# Altium PCB PCB1.PcbDoc
Units mm, origin at the board's own origin, x right, y up, seen from the top; angles counter-clockwise.
Board outline 59.2 x 79.4 mm, 2 copper layers (Top Layer, Bottom Layer); 43 components, 55 nets, 214 pads, 7 vias.
Unrouted connection lines stored in the file: 2.
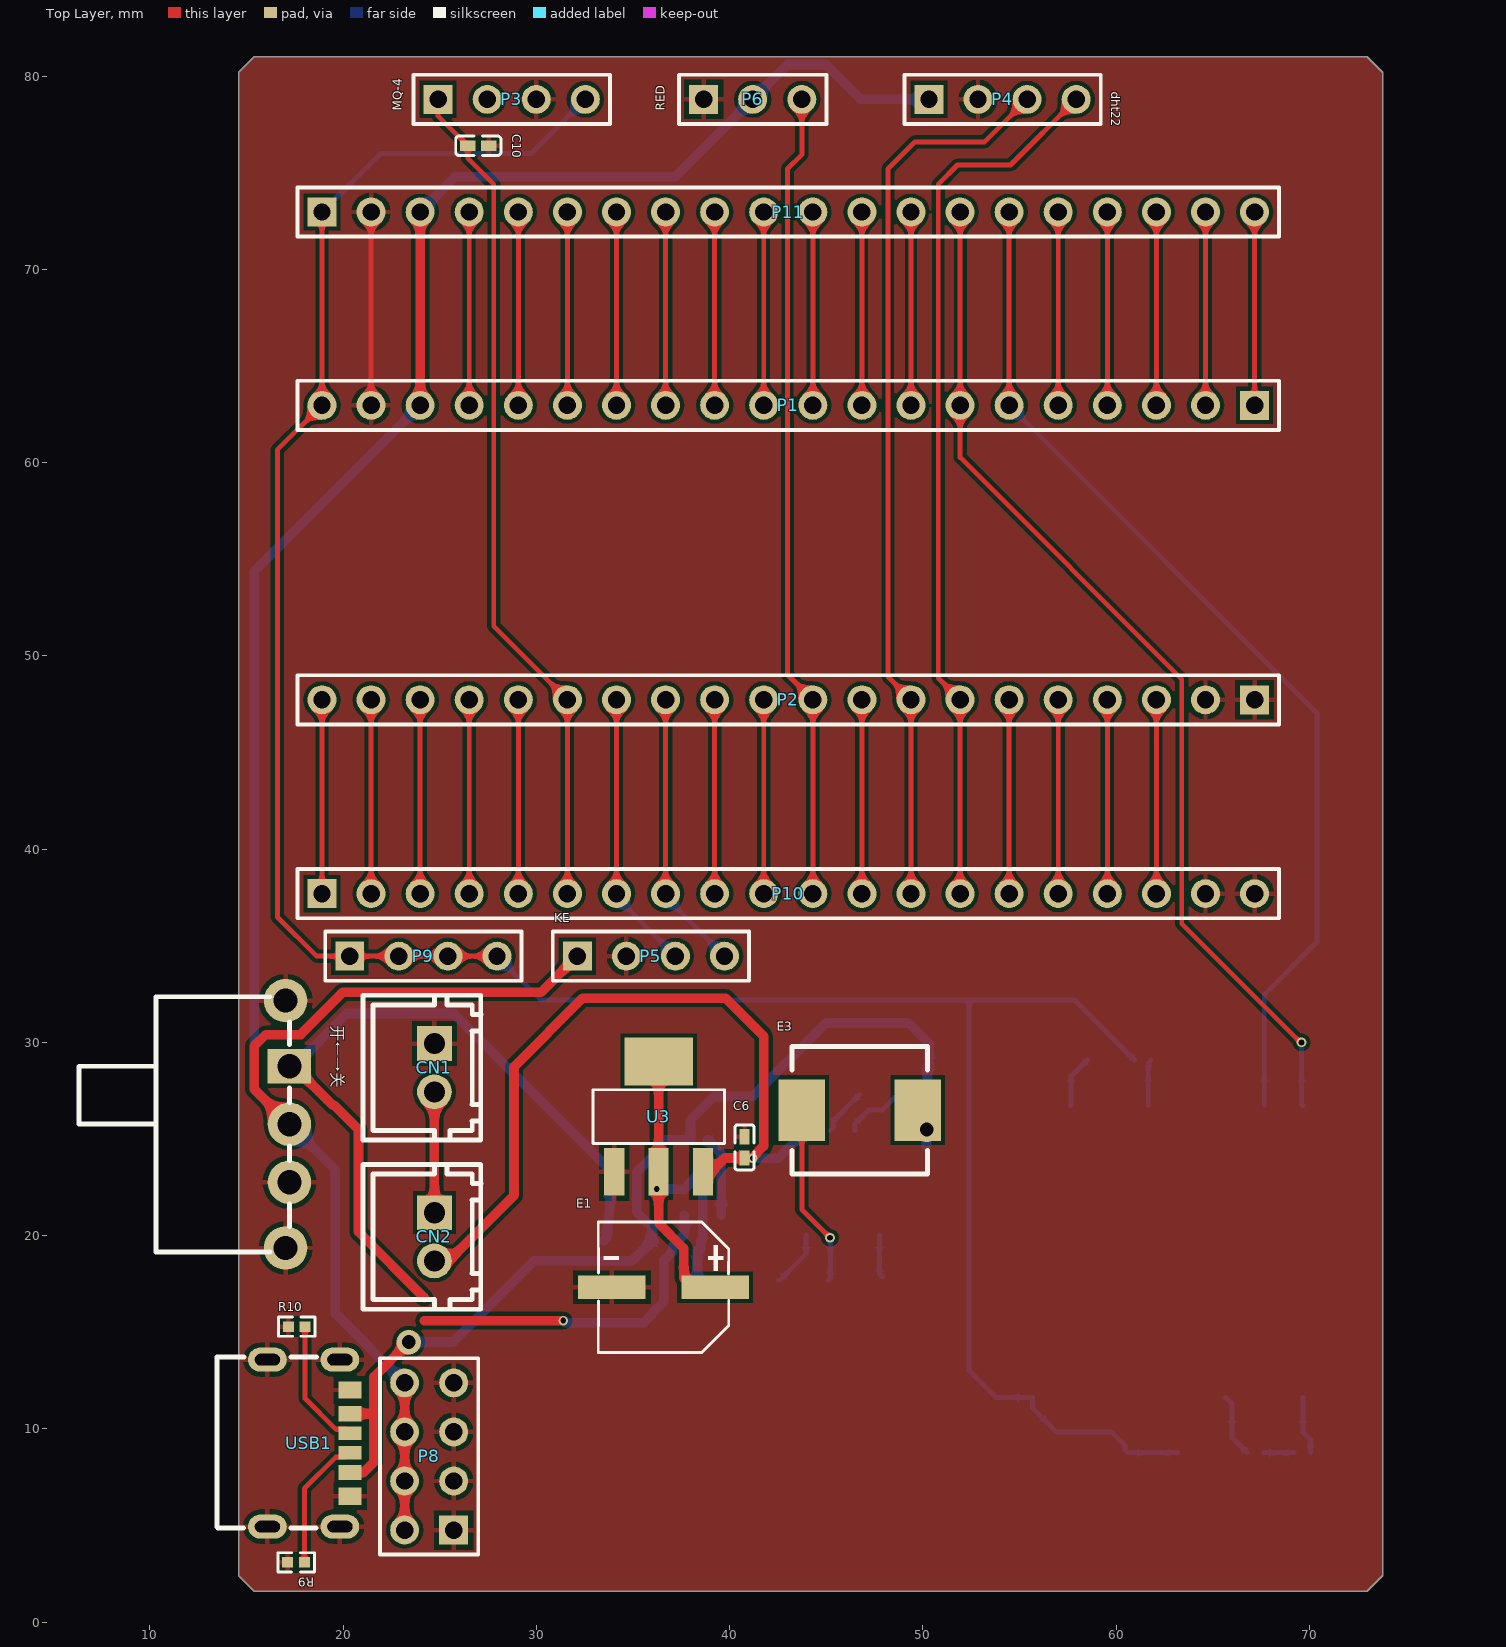
[diagram p0: Top Layer view]
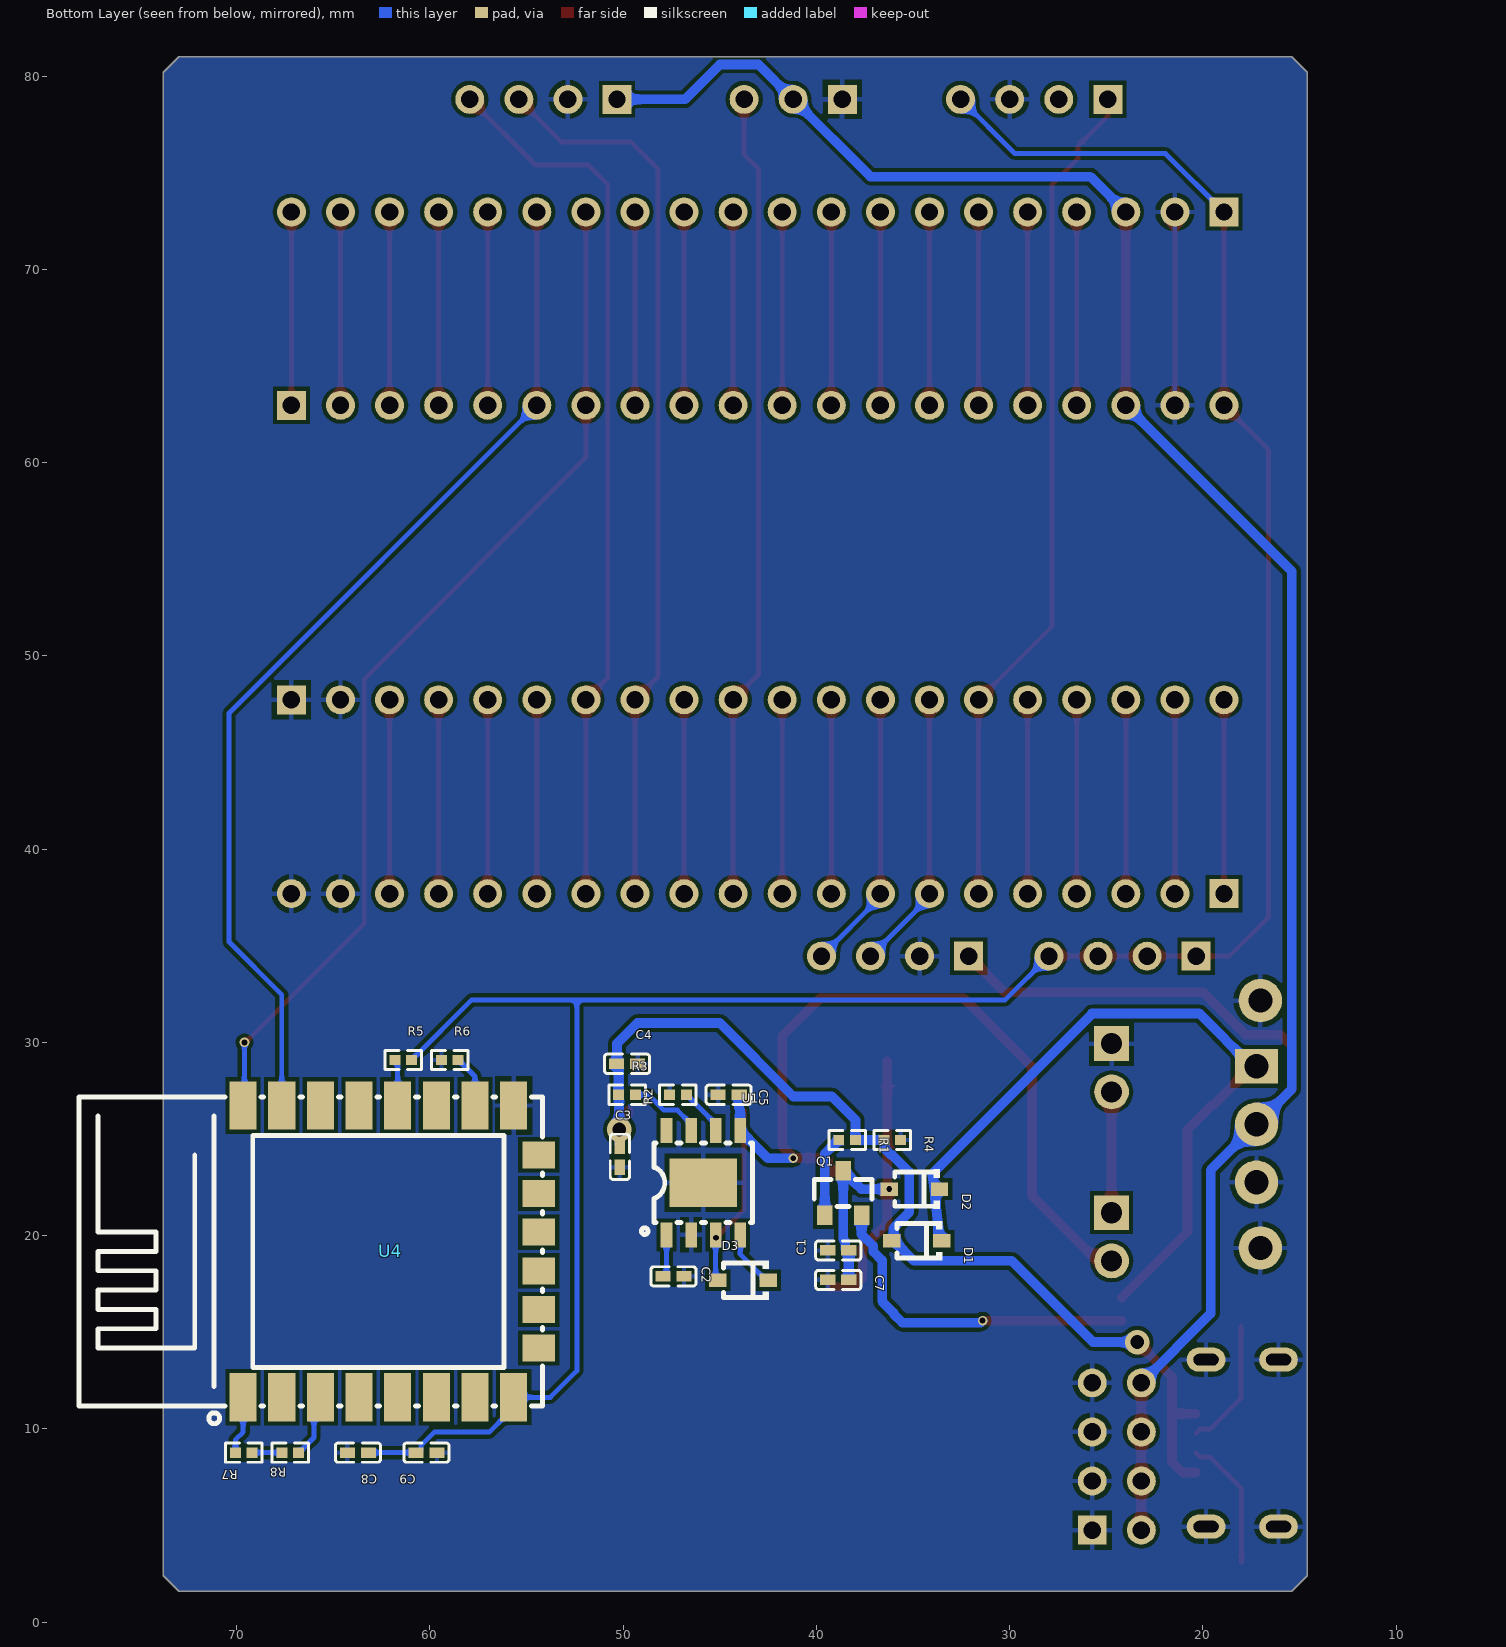
[diagram p1: Bottom Layer view, seen from below]

## Layer stack, top to bottom
Top Solder: solder mask 0.0102, Solder Resist, Dk 3.5
Top Layer: signal copper 0.0356
Dielectric 1: dielectric 0.32, FR-4, Dk 4.8
Bottom Layer: signal copper 0.0356
Bottom Solder: solder mask 0.0102, Solder Resist, Dk 3.5

## Board outline
14.6,2.4 14.6,80.2 15.4,81 73,81 73.8,80.2 73.8,2.4 73,1.6 15.4,1.6

## Design rules (kind name [scope] priority, off if disabled: settings)
Clearance [All] p1: gap=0.2 ignorepadtopadclearanceinfootprint=TRUE
DiffPairsRouting [All] p1: maxlimit=0.254 minlimit=0.1 mostfreqgap=0.254 toplayer_minwidth=0.381 toplayer_maxwidth=0.5 toplayer_prefwidth=0.381 bottomlayer_minwidth=0.381 bottomlayer_maxwidth=0.5 bottomlayer_prefwidth=0.381 maxuncoupledlength=12.7
PolygonConnect [All] p1: connectstyle=Relief reliefconductorwidth=0.254 reliefentries=4 polygonreliefangle="90 Angle" airgapwidth=0.254
RoutingVias [All] p1: holewidth=0.711 width=1.27 viastyle="Through Hole" minholewidth=0.711 minwidth=1.27 maxholewidth=0.711 maxwidth=1.27
SolderMaskExpansion [All] p1: expansion=0.102 istentingtop=FALSE
Width [All] p1: maxlimit=2 minlimit=0.254 preferedwidth=0.254 minimp=50.000000 maximp=50.000000 favimp=50.000000
29 further rules are at their usual default settings.

## Components (designator, comment, footprint, x,y, rotation, side; value= is the part's Value field where it differs from the comment)
C1 "10uF" C0402 38.869,19.231 r180 bottom value=100nF
C2 "10uF" C0402 47.4,17.89 r180 bottom value=100nF
C3 "0.1uF" C0402 50.17,24.076 r90 bottom value=100nF
C4 "10uF" C0402 49.8,28.89 r0 bottom value=100nF
C5 "10uF" C0402 44.545,27.29 r0 bottom value=100nF
C6 "104" C0402 40.774,24.565 r90 top value=100nF
C7 "104" C0402 38.869,17.707 r180 bottom value=100nF
C8 "10uF" C0402 63.727,8.769 r0 bottom value=100nF
C9 "100nF" C0402 60.182,8.769 r180 bottom
C10 "100nF" C0402 27,76.4 r0 top
CN1 "ZX-XH2.54-2PZZ" CONN-TH_2P-P2.50_HX25003-2A 24.727,28.687 r270 top
CN2 "ZX-XH2.54-2PZZ" CONN-TH_2P-P2.50_HX25003-2A 24.727,19.937 r270 top
D1 "1N5819" SOD-323_L1.6-W1.3-LS2.7-RD 34.805,19.739 r0 bottom
D2 "1N5819" SOD-323_L1.6-W1.3-LS2.7-RD 34.932,22.406 r0 bottom
D3 "1N5819WS S4_C2927280" SOD-323_L1.6-W1.3-LS2.7-RD 43.8,17.69 r0 bottom
E1 "220uf" CAP-SMD_BD6.3-L6.6-W6.6-FD 36.583,17.326 r180 top value=220uF
E3 "XR0630-100M" IND-SMD_L7.0-W6.6 46.741,26.489 r0 top value=10uH
P1 "Header 20" HDR1X20 67.17,62.968 r180 top
P2 "Header 20" HDR1X20 67.17,47.728 r180 top
P3 "MQ-4" HDR1X4 24.92,78.8 r0 top
P4 "dht22" HDR1X4 50.32,78.8 r0 top
P5 "KE" HDR1X4 32.12,34.46 r0 top
P6 "RED" HDR1X3 38.66,78.8 r0 top
P8 "Header 4X2" HDR2X4 25.727,4.76 r90 top
P9 "Header 4" HDR1X4 20.347,34.46 r0 top
P10 "Header 20" HDR1X20 18.91,37.695 r0 top
P11 "Header 20" HDR1X20 18.91,72.968 r0 top
Q1 "AO3401A_C15127" SOT-23_L2.9-W1.3-P1.90-LS2.4-BR 38.615,22.199 r270 bottom
R1 "4k7" R0402 38.413,24.946 r0 bottom value=1kΩ
R2 "10K" R0402 47.167,27.29 r180 bottom value=1kΩ
R3 "1K" R0402 49.8,27.29 r0 bottom value=1kΩ
R4 "10k" R0402 36.075,24.946 r180 bottom value=1kΩ
R5 "10k" R0402 61.384,29.089 r0 bottom value=1kΩ
R6 "10k" R0402 58.971,29.089 r0 bottom value=1kΩ
R7 "10k" R0402 69.633,8.769 r180 bottom value=1kΩ
R8 "10k" R0402 67.226,8.769 r0 bottom value=1kΩ
R9 "5.1K" R0402 17.567,3.09 r180 top value=1kΩ
R10 "5.1K" R0402 17.6,15.29 r180 top value=1kΩ
U1 "TPS5430DDAR" ESOP-8_L4.9-W3.9-P1.27-LS6.0-TL-EP 45.852,22.734 r90 bottom
U3 "AMS1117-5.0_C6187" SOT-223_L6.5-W3.5-P2.30-LS7.0-BR 36.329,26.153 r270 top
U4 "ESP-12F(ESP8266MOD)" WIFIM-SMD_ESP-12F-ESP8266MOD 62.019,19.183 r180 bottom value=2.4GHz
USB1 "U262-061N-4BVC11" USB-SMD_U262-061N-4BVC11 18.227,9.26 r270 top
开←→关 "SS-12F23-G4" SW-TH_SS-12F23-G040 17.127,25.76 r270 top (schematic designator 开关)

## Footprints (in the part's own frame and the unit in brackets; to place one, negate y for a bottom-side part, rotate by r counter-clockwise, add the part's x,y. Pads: shape width x height; smd on the part's side, far side on the other; paste and mask are expansions set on the pad)
C0402 [mm]
  rect 0.79x0.54 smd paste-100 mask+0.051: 1(-0.545,0) 2(0.545,0)
  silkscreen extent -1.17,-0.5 1.17,0.5
CAP-SMD_BD6.3-L6.6-W6.6-FD [mm]
  rect 3.5x1.2 smd: 1(-2.67,0) 2(2.67,0)
  silkscreen extent -3.38,-3.38 3.38,3.38
CONN-TH_2P-P2.50_HX25003-2A [mm]
  rect 1.8x1.8 hole 1.1 paste+0 mask+0.05: 1(-1.25,0)
  round 1.8 hole 1.1 paste+0 mask+0.05: 2(1.25,0)
  silkscreen extent -3.75,-3.7 3.75,2.41
ESOP-8_L4.9-W3.9-P1.27-LS6.0-TL-EP [mm]
  rect 1.3x0.6 smd: 1(-2.7,1.905) 2(-2.7,0.635) 3(-2.7,-0.635) 4(-2.7,-1.905) 5(2.7,-1.905) 6(2.7,-0.635) 7(2.7,0.635) 8(2.7,1.905)
  rect 2.5x3.5 smd: 9(0,0)
  silkscreen extent -2.67,-2.55 2.05,3.2
HDR1X3 [mm] "Connector; Header; 3 Position"
  rect 1.5x1.5 hole 0.9: 1(0,0)
  round 1.5 hole 0.9: 2(2.54,0) 3(5.08,0)
  silkscreen extent -1.27,-1.27 6.35,1.27
HDR1X4 [mm] "Connector; Header; 4 Position"
  rect 1.5x1.5 hole 0.9: 1(0,0)
  round 1.5 hole 0.9: 2(2.54,0) 3(5.08,0) 4(7.62,0)
  silkscreen extent -1.27,-1.27 8.89,1.27
HDR1X20 [mm] "Connector; Header; 20 Position"
  rect 1.5x1.5 hole 0.9: 1(0,0)
  round 1.5 hole 0.9: 2(2.54,0) 3(5.08,0) 4(7.62,0) 5(10.16,0) 6(12.7,0) 7(15.24,0) 8(17.78,0) 9(20.32,0) 10(22.86,0) 11(25.4,0) 12(27.94,0) 13(30.48,0) 14(33.02,0) 15(35.56,0) 16(38.1,0) 17(40.64,0) 18(43.18,0) 19(45.72,0) 20(48.26,0)
  silkscreen extent -1.27,-1.27 49.53,1.27
HDR2X4 [mm] "Connector; Header; 4x2 Position"
  rect 1.5x1.5 hole 0.9: 1(0,0)
  round 1.5 hole 0.9: 2(0,2.54) 3(2.54,0) 4(2.54,2.54) 5(5.08,0) 6(5.08,2.54) 7(7.62,0) 8(7.62,2.54)
  silkscreen extent -1.27,-1.27 8.89,3.81
IND-SMD_L7.0-W6.6 [mm]
  rect 2.4x3.2 smd: 1(-3,0) 2(3,0)
  silkscreen extent -3.5,-3.3 3.5,3.3
R0402 [mm]
  rect 0.566x0.54 smd paste-100 mask+0.051: 1(-0.433,0) 2(0.433,0)
  silkscreen extent -0.94,-0.5 0.94,0.5
SOD-323_L1.6-W1.3-LS2.7-RD [mm]
  rect 0.9x0.7 smd paste+0 mask+0.05: 1(-1.3,0) 2(1.3,0)
  silkscreen extent -1.32,-1.02 1.02,1.02
SOT-23_L2.9-W1.3-P1.90-LS2.4-BR [mm]
  rect 1x0.8 smd: 1(1.15,-0.95) 2(1.15,0.95) 3(-1.15,0)
  silkscreen extent -0.7,-1.5 0.7,1.5
SOT-223_L6.5-W3.5-P2.30-LS7.0-BR [mm]
  rect 2.465x1.05 smd: 1(2.858,-2.3) 2(2.858,0) 3(2.858,2.3)
  rect 2.465x3.54 smd: 4(-2.857,0)
  silkscreen extent -1.4,-3.4 1.4,3.4
SW-TH_SS-12F23-G040 [mm]
  rect 1.8x2.25 hole 1.25 paste+0 mask+0.05: 1(-3,0.1)
  round 2.25 hole 1.25 paste+0 mask+0.05: 2(0,0.1) 3(3,0.1) 4(6.4,-0.1) 5(-6.4,-0.1)
  silkscreen extent -6.6,-10.8 6.6,0.1
USB-SMD_U262-061N-4BVC11 [mm]
  oval 1.25x2 hole 0.6 slot 1.3 at 90 deg paste+0 mask+0.05: 7(-4.32,1.611) 8(4.32,1.611) 9(-4.32,-2.139) 10(4.32,-2.139)
  rect 0.7x1.2 smd paste-100 mask+0.05: A5(-0.5,2.139) B5(0.5,2.139)
  rect 0.8x1.2 smd paste-100 mask+0.05: A9(1.52,2.139) B9(-1.52,2.139)
  rect 0.9x1.2 smd paste-100 mask+0.05: A12(2.75,2.139) B12(-2.75,2.139)
  silkscreen extent -4.47,-4.75 4.4,0.39
WIFIM-SMD_ESP-12F-ESP8266MOD [mm]
  rect 1.4x2.5 smd: 1(-7.651,-7.551) 2(-5.651,-7.551) 3(-3.651,-7.551) 4(-1.651,-7.551) 5(0.349,-7.551) 6(2.349,-7.551) 7(4.349,-7.551) 8(6.349,-7.551) 9(6.349,7.549) 10(4.349,7.55) 11(2.349,7.551) 12(0.349,7.551) 13(-1.651,7.55) 14(-3.651,7.551) 15(-5.651,7.55) 16(-7.651,7.551)
  rect 1.7x1.4 smd: 17(7.651,-5) 18(7.649,-3.002) 19(7.65,-1.003) 20(7.65,0.997) 21(7.65,2.997) 22(7.65,4.997)
  silkscreen extent -16.15,-8.92 7.85,8

## Part data
C1 C2 C3 C4 C5 C6 C7 C8 C9 C10: library part GRM155R71H104KE14D, JLCPCB Part Class="Extended Part", LCSC Part Name="100nF ±10% 50V", Manufacturer=muRata(村田, Temperature Coefficient=X7R, Tolerance=±10%, Voltage Rated=50V, Add into BOM=yes, Convert to PCB=yes, Datasheet=https://atta.szlcsc.com/upload/public/pdf/source/20180326/C77020_39BD49C951FF1AF0DB1F1FAC5AC1E401.pdf, Device=GRM155R71H104KE14D, Manufacturer Part=GRM155R71H104KE14D, Supplier=LCSC, Supplier Footprint=0402, Supplier Part=C77020, Symbol=GRM155R71H104KE14D
CN1 CN2: Current Rating (Max)=3A, JLCPCB Part Class="Extended Part", Manufacturer=Megastar(兆星, Operating Temperature Range=-25℃~+85?, Add into BOM=yes, Contact Material=黄?, Contact Plating=锡, Convert to PCB=yes, Datasheet=https://atta.szlcsc.com/upload/public/pdf/source/20230619/19BA6947230AA44A04D3EDD65E618FD0.pdf, Device=ZX-XH2.54-2PZZ, LCSC Part Name=ZX-XH2.54-2PZZ, Manufacturer Part=ZX-XH2.54-2PZZ, Mounting Style=直?, Number of Pins=2P, Number of PINs Per Row=2, Number of Rows=1, Pins Structure=1x2P, Pitch=2.54mm, Reference Series=XH, Row Spacing=-, Supplier=LCSC, Supplier Footprint=插件,P=2.54m, Supplier Part=C7429632, Symbol=ZX-XH2.54-2PZZ
D1 D2: library part "1N5819WS S4_C2927280", Average Rectified Current (Io)=350mA, Forward Voltage (Vf@If)=600mV@200mA, JLCPCB Part Class="Extended Part", LCSC Part Name="电压:40V 电流:35", Manufacturer=JSMSEMI(杰盛?, Manufacturer Part="1N5819WS S4", Reverse Leakage Current (Ir)=5uA@30V, Reverse Voltage (Vr)=40V, Add into BOM=yes, Convert to PCB=yes, Datasheet=https://atta.szlcsc.com/upload/public/pdf/source/20240105/574E572B69D2DF1CD36E5C05FAB269C4.pdf, Device="1N5819WS S4_C2927280", Diode Configuration=独立, Supplier=LCSC, Supplier Footprint=SOD-323, Supplier Part=C2927280, Symbol="1N5819WS S4"
D3: Average Rectified Current (Io)=350mA, Forward Voltage (Vf@If)=600mV@200mA, JLCPCB Part Class="Extended Part", LCSC Part Name="电压:40V 电流:35", Manufacturer=JSMSEMI(杰盛?, Manufacturer Part="1N5819WS S4", Reverse Leakage Current (Ir)=5uA@30V, Reverse Voltage (Vr)=40V, Add into BOM=yes, Convert to PCB=yes, Datasheet=https://atta.szlcsc.com/upload/public/pdf/source/20240105/574E572B69D2DF1CD36E5C05FAB269C4.pdf, Device="1N5819WS S4_C2927280", Diode Configuration=独立, Supplier=LCSC, Supplier Footprint=SOD-323, Supplier Part=C2927280, Symbol="1N5819WS S4"
E1: library part RST220UF10V018, Equivalent Series Resistance(ESR)=-, JLCPCB Part Class="Extended Part", LCSC Part Name="220uF ±20% 10V", Lifetime @ Temp=2000hrs@105℃, Manufacturer=KNSCHA(科尼?, Operating Temperature=-40℃~+105?, Rated Voltage=10V, Ripple Current=85mA@120Hz, Tolerance=±20%, Add into BOM=yes, Convert to PCB=yes, Datasheet=https://atta.szlcsc.com/upload/public/pdf/source/20220722/AD247F0826B90D1CD53BDFA96956336C.pdf, Device=RST220UF10V018, L=5.4mm, Manufacturer Part=RST220UF10V018, Supplier=LCSC, Supplier Footprint=SMD,D6.3xL5.4mm, Supplier Part=C4747973, Symbol=RST220UF10V018, φD=6.3mm
E3: DC Resistance (DCR)=68mΩ, JLCPCB Part Class="Extended Part", LCSC Part Name="10uH ±20% 5.5A", Manufacturer=XR(祥如, Rated Current=4.5A, Saturation Current (Isat)=5.5A, Tolerance=±20%, Add into BOM=yes, Convert to PCB=yes, Datasheet=https://atta.szlcsc.com/upload/public/pdf/source/20240328/FF0C10B64CBAAE6FA647F96E85C1BA7B.pdf, Device=XR0630-100M, Manufacturer Part=XR0630-100M, Supplier=LCSC, Supplier Footprint=SMD,0630, Supplier Part=C5307622, Symbol=XR0630-100M, Type=一体成?
P1 P2 P10 P11: "Header, 20-Pin", LatestRevisionDate=17-Jul-2002, LatestRevisionNote="Re-released for DXP Platform.", Publisher="Altium Limited"
P3 P4 P5: library part "Header 4", "Header, 4-Pin", LatestRevisionDate=17-Jul-2002, LatestRevisionNote="Re-released for DXP Platform.", Publisher="Altium Limited"
P6: library part "Header 3", "Header, 3-Pin", LatestRevisionDate=17-Jul-2002, LatestRevisionNote="Re-released for DXP Platform.", Publisher="Altium Limited"
P8: "Header, 4-Pin, Dual row", LatestRevisionDate=17-Jul-2002, LatestRevisionNote="Re-released for DXP Platform.", Publisher="Altium Limited"
P9: "Header, 4-Pin", LatestRevisionDate=17-Jul-2002, LatestRevisionNote="Re-released for DXP Platform.", Publisher="Altium Limited"
Q1: Continuous Drain Current (Id)=4A, Drain Source On Resistance (RDS(on)@Vgs,Id)=44mΩ@10V,4.3A, Drain Source Voltage (Vdss)=30V, Gate Threshold Voltage (Vgs(th)@Id)=1.3V@250uA, Input Capacitance (Ciss@Vds)=1.2nF@15V, JLCPCB Part Class="Basic Part", LCSC Part Name="1个P沟道 耐压:30V ?", Manufacturer=AOS, Manufacturer Part=AO3401A, Operating Temperature=-55℃~+150℃@(Tj, Power Dissipation (Pd)=1.4W, Add into BOM=yes, Convert to PCB=yes, Datasheet=https://atta.szlcsc.com/upload/public/pdf/source/20160507/1462613609053.pdf, Device=AO3401A_C15127, Supplier=LCSC, Supplier Footprint=SOT-23, Supplier Part=C15127, Symbol=AO3401A, Total Gate Charge (Qg@Vgs)=12.2nC@4.5V, Type=1个P沟
R1 R2 R3 R4 R5 R6 R7 R8 R9 R10: library part 0402WGF1001TCE, JLCPCB Part Class="Basic Part", LCSC Part Name="1kΩ ±1% 62.5mW 厚?", Manufacturer=UNI-ROYAL(厚声, Operating Temperature Range=-55℃~+155?, Overload Voltage (Max)=50V, Power(Watts)=62.5mW, Temperature Coefficient=±100ppm/?, Tolerance=±1%, Add into BOM=yes, Convert to PCB=yes, Datasheet=https://atta.szlcsc.com/upload/public/pdf/source/20200306/C422600_1E6D84923E4A46A82E41ADD87F860B5C.pdf, Device=0402WGF1001TCE, Manufacturer Part=0402WGF1001TCE, Supplier=LCSC, Supplier Footprint=0402, Supplier Part=C11702, Symbol=0402WGF1001TCE, Type=厚膜?
U1: library part CS5090E, Input Voltage=5.5V~36V, JLCPCB Part Class="Basic Part", LCSC Part Name="降压 3A 36", Manufacturer=TI(德州仪, Operating Temperature=-40℃~+125℃@(TJ, Output Current (Max)=3A, Output Voltage=1.221V~32.04V, Switching Frequency=500kHz, Add into BOM=yes, Convert to PCB=yes, Datasheet=https://www.ti.com/cn/lit/gpn/tps5430, Device=TPS5430DDAR, Function=降压, Manufacturer Part=TPS5430DDAR, Number of Outputs=1, Output Type=可?, Supplier=LCSC, Supplier Footprint=SOIC-8-EP, Supplier Part=C9864, Switch tube (built-in/external)=内?, Symbol=TPS5430DDAR, Synchronous Rectification=否, Topology=降压
U3: Dropout Voltage=1.3V@(1A), JLCPCB Part Class="Basic Part", LCSC Part Name="输入12V 输出5V", Manufacturer=AMS, Manufacturer Part=AMS1117-5.0, Maximum Input Voltage=12V, MAX Output Current=1A, Operating Temperature=-, Output Voltage=5V, Power Supply Rejection Ratio (PSRR)=68dB@(120Hz), Add into BOM=yes, Convert to PCB=yes, Datasheet=https://atta.szlcsc.com/upload/public/pdf/source/20230918/E4B716057EE82179D88E8A0894830D59.pdf, Device=AMS1117-5.0_C6187, Feature=-, Noise=-, Number of Outputs=1, Output Polarity=正?, Output Type=固?, standby current=-, Supplier=LCSC, Supplier Footprint=SOT-223, Supplier Part=C6187, Symbol=AMS1117-5.0
U4: JLCPCB Part Class="Extended Part", LCSC Part Name=完整的802.11b/g/nWi-FiSoC, Manufacturer=Ai-Thinker(安信?, Operating Temperature=-40℃~+85?, Operating Voltage=3.3V, Output Power=16dBm, Receive  Current=120mA, Send  Current=170mA, Add into BOM=yes, Antenna Type=板载PCB?, Convert to PCB=yes, Core Processor=ESP8266芯?, Datasheet=https://atta.szlcsc.com/upload/public/pdf/source/20210219/C82891_ABD84A460F4F056A2757267CCCA4B508.pdf, Device=ESP-12F(ESP8266MOD), Manufacturer Part=ESP-12F(ESP8266MOD), Sensitivity=-90dBm, Supplier=LCSC, Supplier Footprint=SMD,16x24mm, Supplier Part=C82891, Support Interface=GPIO；UART；I2C；PWM；SPI?, Symbol=ESP-12F(ESP8266MOD), Wireless Standard=-
USB1: Current Rating - Power (Max)=5A, JLCPCB Part Class="Extended Part", LCSC Part Name="Type-C 母 卧", Manufacturer="XKB Connection(中国星", Operating Temperature Range=-25℃~+85?, Soldering Temperature(Max)=260℃, Add into BOM=yes, Connector Type=Type-C, Contact Material=铜合, Contact Plating=金, Convert to PCB=yes, Datasheet=https://atta.szlcsc.com/upload/public/pdf/source/20210602/C2764612_915BA3D27A0B76A9D989108E3A082B29.pdf, Device=U262-061N-4BVC11, Gender=母, Manufacturer Part=U262-061N-4BVC11, Mounting Style=卧?, Number of Contacts=6P, Number of Ports=1, Standard="USB 3.1", Supplier=LCSC, Supplier Footprint=SMD, Supplier Part=C2764612, Symbol=U262-061N-4BVC11
开←→关: Actuator Color=黑?, JLCPCB Part Class="Extended Part", LCSC Part Name=拨动?, Manufacturer=DEALON(德艺?, Actuator Style=矩形?, Add into BOM=yes, Circuit=单刀?, Convert to PCB=yes, Datasheet=https://atta.szlcsc.com/upload/public/pdf/source/20220428/B341684C4335C21BC408331FBC341DAE.pdf, Device=SS-12F23-G4, Manufacturer Part=SS-12F23-G4, Mechanical Life=-, Mounting Style=侧?, Pin Style=PC引?, Supplier=LCSC, Supplier Footprint=插?, Supplier Part=C2998806, Switch Height=9mm, Switch Length=13mm, Switch Width=5.8mm, Symbol=SS-12F23-G4

## Via types
v1: diameter 0.5, hole 0.3, Top Layer to Bottom Layer, 5 vias
v2: diameter 1.27, hole 0.711, Top Layer to Bottom Layer, 2 vias

## Nets (pads, with @x,y where several pads share a name; then routed paths per layer and width w, separated by ;. In a path a pad name is that pad's centre, name@x,y a point inside that pad or via, vN(x,y) a via of type N, cw(c..) or ccw(c..) an arc to the next point about the centre after c; other vN are vias at no path point)
3.3V: C8.1 C9.1 P1.20 P3.4 P9.1 P9.2 P9.3 P9.4 P11.1 R5.1 R7.2 R8.2 U4.8 | length 134.6
  Top Layer w0.254: P11.1 P1.20 16.6,60.658 16.6,36.49 18.63,34.46 P9.1 P9.2 P9.3 P9.4
  Bottom Layer w0.254: P11.1 21.942,76 29.74,76 P3.4 ; P9.4 30.227,32.2 52.4,32.2 ; R5.1 57.84,32.2 52.4,32.2 ; C8.1 C9.1 60.602,8.769 60.459,8.912 60.459,9.151 59.78,9.83 56.922,9.83 55.67,11.082 U4.8 53.768,11.632 52.4,13 52.4,32.2 ; R8.2 R7.2
5_OUT: D1.1 D2.1 Q1.2 开←→关.1 | length 57.7
  Top Layer w0.5: 开←→关.1 17.452,28.76 19.473,26.738 19.552,26.738 20.8,25.49 20.8,20.2 24.2,16.8 ; 24.2,15.6 v1(31.4,15.6)
  Bottom Layer w0.5: 开←→关.1 17.452,28.76 20.182,31.49 25.748,31.49 25.748,31.457 33.999,23.206 33.908,22.376 33.632,19.866 D1.1 ; v1(31.4,15.6) 31.51,15.49 35.549,15.49 36,15.941 36,16 36.6,16.6 36.6,18.721 37.059,19.18 37.059,19.459 37.665,20.065 Q1.2
5V_BAT: C1.2 C7.2 D2.2 E1.1 Q1.3 U3.2 U3.4 | length 22.1
  Top Layer w0.5: U3.4 U3.2 36.329,20.645 37.63,19.344 37.63,17.799 38.103,17.326 E1.1
  Bottom Layer w0.5: v1(36.232,22.406) 37.672,22.406 38.242,22.976 38.342,22.976 Q1.3@38.615,23.249 ; C7.2 C1.2 38.449,19.231 38.515,19.297 38.515,19.71 38.615,19.81 Q1.3@38.615,23.249 ; Q1.3 Q1.3@38.615,23.249
+5: P1.18 P4.1 P5.1 P6.2 P8.2 P8.4 P8.6 P8.8 P11.3 开←→关.2 | length 129.2
  Top Layer w0.5: 开←→关.2@16.84,25.76 开←→关.2 15.4,27.587 15.4,29.8 16,30.4 17.8,30.4 20,32.6 30.26,32.6 P5.1 ; P8.8 P8.6 P8.4 P8.2 P8.2@23.21,4.737 ; P11.3@23.922,72.968 P11.3 P1.18
  Bottom Layer w0.5: P8.8 19.6,15.967 19.6,23.387 开←→关.2 15.398,27.589 15.398,54.376 P1.18 ; P11.3 25.822,74.8 37.2,74.8 P6.2 43,80.6 45,80.6 46.8,78.8 P4.1
BAT: C5.1 C6.1 CN2.2 U1.5 U3.3 | length 42
  Top Layer w0.5: CN2.2 25.454,18.687 28.847,22.081 28.847,28.737 32.4,32.29 39.8,32.29 41.77,30.32 41.77,24.634 41.156,24.02 C6.1 39.754,24.02 39.029,23.295 U3.3
  Bottom Layer w0.5: v1(41.2,24) 42.514,24 U1.5 43.947,26.51 44,26.563 C5.1
GND: C1.1 C2.2 C3.1 C4.1 C5.2 C6.2 C7.1 C8.2 C9.2 C10.2 CN1.1 E1.2 P1.19 P2.1 P2.2 P3.3 P4.2 P5.2 P6.1 P8.1 P8.3 P8.5 P8.7 P10.19 P10.20 P11.2 R2.1 R4.2 R6.2 R9.2 R10.2 U1.2 U1.9 U3.1 U4.9 USB1.7 USB1.8 USB1.9 USB1.10 USB1.A12 USB1.B12 开←→关.3 开←→关.4 开←→关.5 | length 10
  Top Layer w0.254: P1.19 P11.2
NetC2_1: C2.1 U1.1 | length 2.2
  Bottom Layer w0.254: U1.1 47.757,18.033 47.9,17.89 C2.1
NetCN1_2: CN1.2 CN2.1 | length 6.3
  Top Layer w0.5: CN2.1 CN1.2
NetD3_1: D3.1 U1.4 | length 3
  Bottom Layer w0.254: D3.1 42.6,17.69 43.947,19.037 U1.4
NetD3_2: D3.2 E3.1 U1.3 | length 9.6
  Top Layer w0.254: E3.1 43.741,21.349 v1(45.2,19.89)
  Bottom Layer w0.254: D3.2 45.217,17.807 U1.3
NetP1_1: P1.1 P11.20 | length 10
  Top Layer w0.254: P1.1 P11.20
NetP1_2: P1.2 P11.19 | length 10
  Top Layer w0.254: P1.2 P11.19
NetP1_3: P1.3 P11.18 | length 10
  Top Layer w0.254: P1.3 P11.18
NetP1_4: P1.4 P11.17 | length 10
  Top Layer w0.254: P1.4 P11.17
NetP1_5: P1.5 P11.16 | length 10
  Top Layer w0.254: P1.5 P11.16
NetP1_8: P1.8 P11.13 | length 10
  Top Layer w0.254: P1.8 P11.13
NetP1_9: P1.9 P11.12 | length 10
  Top Layer w0.254: P1.9 P11.12
NetP1_10: P1.10 P11.11 | length 10
  Top Layer w0.254: P1.10 P11.11
NetP1_11: P1.11 P11.10 | length 10
  Top Layer w0.254: P1.11 P11.10
NetP1_12: P1.12 P11.9 | length 10
  Top Layer w0.254: P1.12 P11.9
NetP1_13: P1.13 P11.8 | length 10
  Top Layer w0.254: P1.13 P11.8
NetP1_14: P1.14 P11.7 | length 10
  Top Layer w0.254: P1.14 P11.7
NetP1_15: P1.15 P11.6 | length 10
  Top Layer w0.254: P1.15 P11.6
NetP1_16: P1.16 P11.5 | length 10
  Top Layer w0.254: P1.16 P11.5
NetP1_17: P1.17 P11.4 | length 10
  Top Layer w0.254: P1.17 P11.4
NetP2_3: P2.3 P10.18 | length 10
  Top Layer w0.254: P10.18@62.09,37.728 P2.3
NetP2_4: P2.4 P10.17 | length 10
  Top Layer w0.254: P10.17@59.55,37.728 P2.4
NetP2_5: P2.5 P10.16 | length 10
  Top Layer w0.254: P10.16@57.01,37.728 P2.5
NetP2_6: P2.6 P10.15 | length 10
  Top Layer w0.254: P10.15@54.47,37.728 P2.6
NetP2_9: P2.9 P10.12 | length 10
  Top Layer w0.254: P10.12@46.85,37.728 P2.9
NetP2_11: P2.11 P10.10 | length 10
  Top Layer w0.254: P10.10@41.77,37.728 P2.11
NetP2_12: P2.12 P10.9 | length 10
  Top Layer w0.254: P10.9@39.23,37.728 P2.12
NetP2_16: P2.16 P10.5 | length 10
  Top Layer w0.254: P10.5 P2.16
NetP2_17: P2.17 P10.4 | length 10
  Top Layer w0.254: P10.4 P2.17
NetP2_18: P2.18 P10.3 | length 10
  Top Layer w0.254: P10.3 P2.18
NetP2_19: P2.19 P10.2 | length 10
  Top Layer w0.254: P10.2 P2.19
NetP2_20: P2.20 P10.1 | length 10
  Top Layer w0.254: P10.1 P2.20
NetQ1_1: Q1.1 R1.2 | length 4.2
  Bottom Layer w0.254: R1.2 R1.2@38.859,24.946
  Bottom Layer w0.5: R1.2@38.859,24.946 39.565,24.239 Q1.1
NetR2_2: R2.2 U1.6 | length 2.5
  Bottom Layer w0.254: U1.6 45.39,25.607 45.39,25.959 46.722,27.29 R2.2
NetR3_1: R3.1 U1.7 | length 3.9
  Bottom Layer w0.254: U1.7 46.487,25.784 47.194,26.49 47.892,26.49 48.692,27.29 R3.1
NetR5_2: R5.2 U4.12 | length 2.4
  Bottom Layer w0.254: U4.12 61.67,28.946 61.813,29.089 R5.2
NetR6_1: R6.1 U4.10 | length 2.7
  Bottom Layer w0.254: U4.10 57.67,28.233 58.525,29.089 R6.1
NetR7_1: R7.1 U4.1 | length 3
  Bottom Layer w0.254: U4.1 69.67,9.83 70.066,9.434 R7.1
NetR8_1: R8.1 U4.3 | length 3.3
  Bottom Layer w0.254: U4.3 66,11.301 66,9.549 66.78,8.769 R8.1
NetR9_1: R9.1 USB1.B5 | length 7
  Top Layer w0.254: R9.1 18,6.913 19.624,8.537 20.143,8.537 USB1.B5
NetR10_1: R10.1 USB1.A5 | length 6.8
  Top Layer w0.254: R10.1 18.033,11.574 19.624,9.983 20.143,9.983 USB1.A5
PA1: C10.1 P2.15 P3.1 P10.6 | length 43.8
  Top Layer w0.254: P3.1 24.92,77.935 C10.1 26.455,75.745 27.8,74.4 27.8,51.538 P2.15 P10.6@31.61,37.728
PA6: P2.10 P6.3 P10.11 | length 41.9
  Top Layer w0.254: P6.3 43.74,75.94 43,75.2 43,49.038 P2.10 P10.11@44.31,37.728
PB0: P2.8 P4.3 P10.13 | length 46.7
  Top Layer w0.254: P10.13@49.39,37.728 P2.8 48.2,48.918 48.2,75.2 49.6,76.6 53.2,76.6 P4.3
PB1: P2.7 P4.4 P10.14 | length 46.1
  Top Layer w0.254: P10.14@51.93,37.728 P2.7 50.8,48.858 50.8,50.599 50.799,50.6 50.799,74.399 51.8,75.4 54.54,75.4 P4.4
RXD1: P1.7 P11.14 U4.16 | length 53.6
  Top Layer w0.254: P11.14 P1.7 51.93,60.27 63.4,48.8 63.4,36.137 69.537,30 v1(69.6,30)
  Bottom Layer w0.254: v1(69.6,30) 69.6,26.803 U4.16
RXD2: P2.13 P5.4 P10.8 | length 14.5
  Top Layer w0.254: P10.8@36.69,37.728 P2.13
  Bottom Layer w0.254: P10.8 36.69,37.51 P5.4
TXD1: P1.6 P11.15 U4.15 | length 54
  Top Layer w0.254: P1.6 P11.15
  Bottom Layer w0.254: P1.6 70.4,47.038 70.4,35.2 67.67,32.47 U4.15
TXD2: P2.14 P5.3 P10.7 | length 14.5
  Top Layer w0.254: P10.7@34.15,37.728 P2.14
  Bottom Layer w0.254: P10.7 34.15,37.51 P5.3
Vbus: C3.2 C4.2 D1.2 E3.2 R1.1 R3.2 R4.1 USB1.A9 USB1.B9 | length 53.7
  Top Layer w0.5: USB1.A9 21.05,7.74 21.6,8.29 21.6,10.89 ; USB1.B9 21.49,10.78 21.6,10.89 ; v2(23.4,14.49) 21.6,12.69 21.6,10.89 ; E3.2 49.741,26.349 E3.2@49.8,26.29
  Bottom Layer w0.5: v2(23.4,14.49) 25.69,14.49 29.89,18.69 34.956,18.69 D1.2@36.005,19.739 ; D1.2 D1.2@36.005,19.739 ; C3.2 50.185,24.636 50.185,25.475 v2(50.2,25.49) 50.216,25.506 50.216,27.274 R3.2 50.233,28.778 C4.2 50.32,28.915 50.32,29.937 49.257,31 45,31 41.2,27.2 39.2,27.2 37.98,25.98 R1.1 R4.1 36.495,24.946 36.495,24.585 36.429,24.519 36.429,24.467 36.134,24.172 36.082,24.172 35.2,23.29 35.2,21.2 36.005,20.395 D1.2@36.005,19.739
pads on no net: P3.2 U1.8 U4.2 U4.4 U4.5 U4.6 U4.7 U4.11 U4.13 U4.14 U4.17 U4.18 U4.19 U4.20 U4.21 U4.22

## Polygon pours and split planes (outlines as drawn)
GND on Bottom Layer "Top Layer-No Net1" (solid, pour order 5): 14.6,2.4 14.6,80.2 15.4,81 73,81 73.8,80.2 73.8,2.4 73,1.6 15.4,1.6
GND on Top Layer "Top Layer-No Net" (solid, pour order 4): 14.6,2.4 14.6,80.2 15.4,81 73,81 73.8,80.2 73.8,2.4 73,1.6 15.4,1.6